# Altium PCB MCU.PcbDoc (part 3 of 3)
Units mm, origin at the board's own origin, x right, y up, seen from the top; angles counter-clockwise.
Board outline 98.27 x 98.24 mm, 2 copper layers (Top Layer, Bottom Layer); 274 components, 263 nets, 1117 pads, 8 vias.
Unrouted connection lines stored in the file: 819.
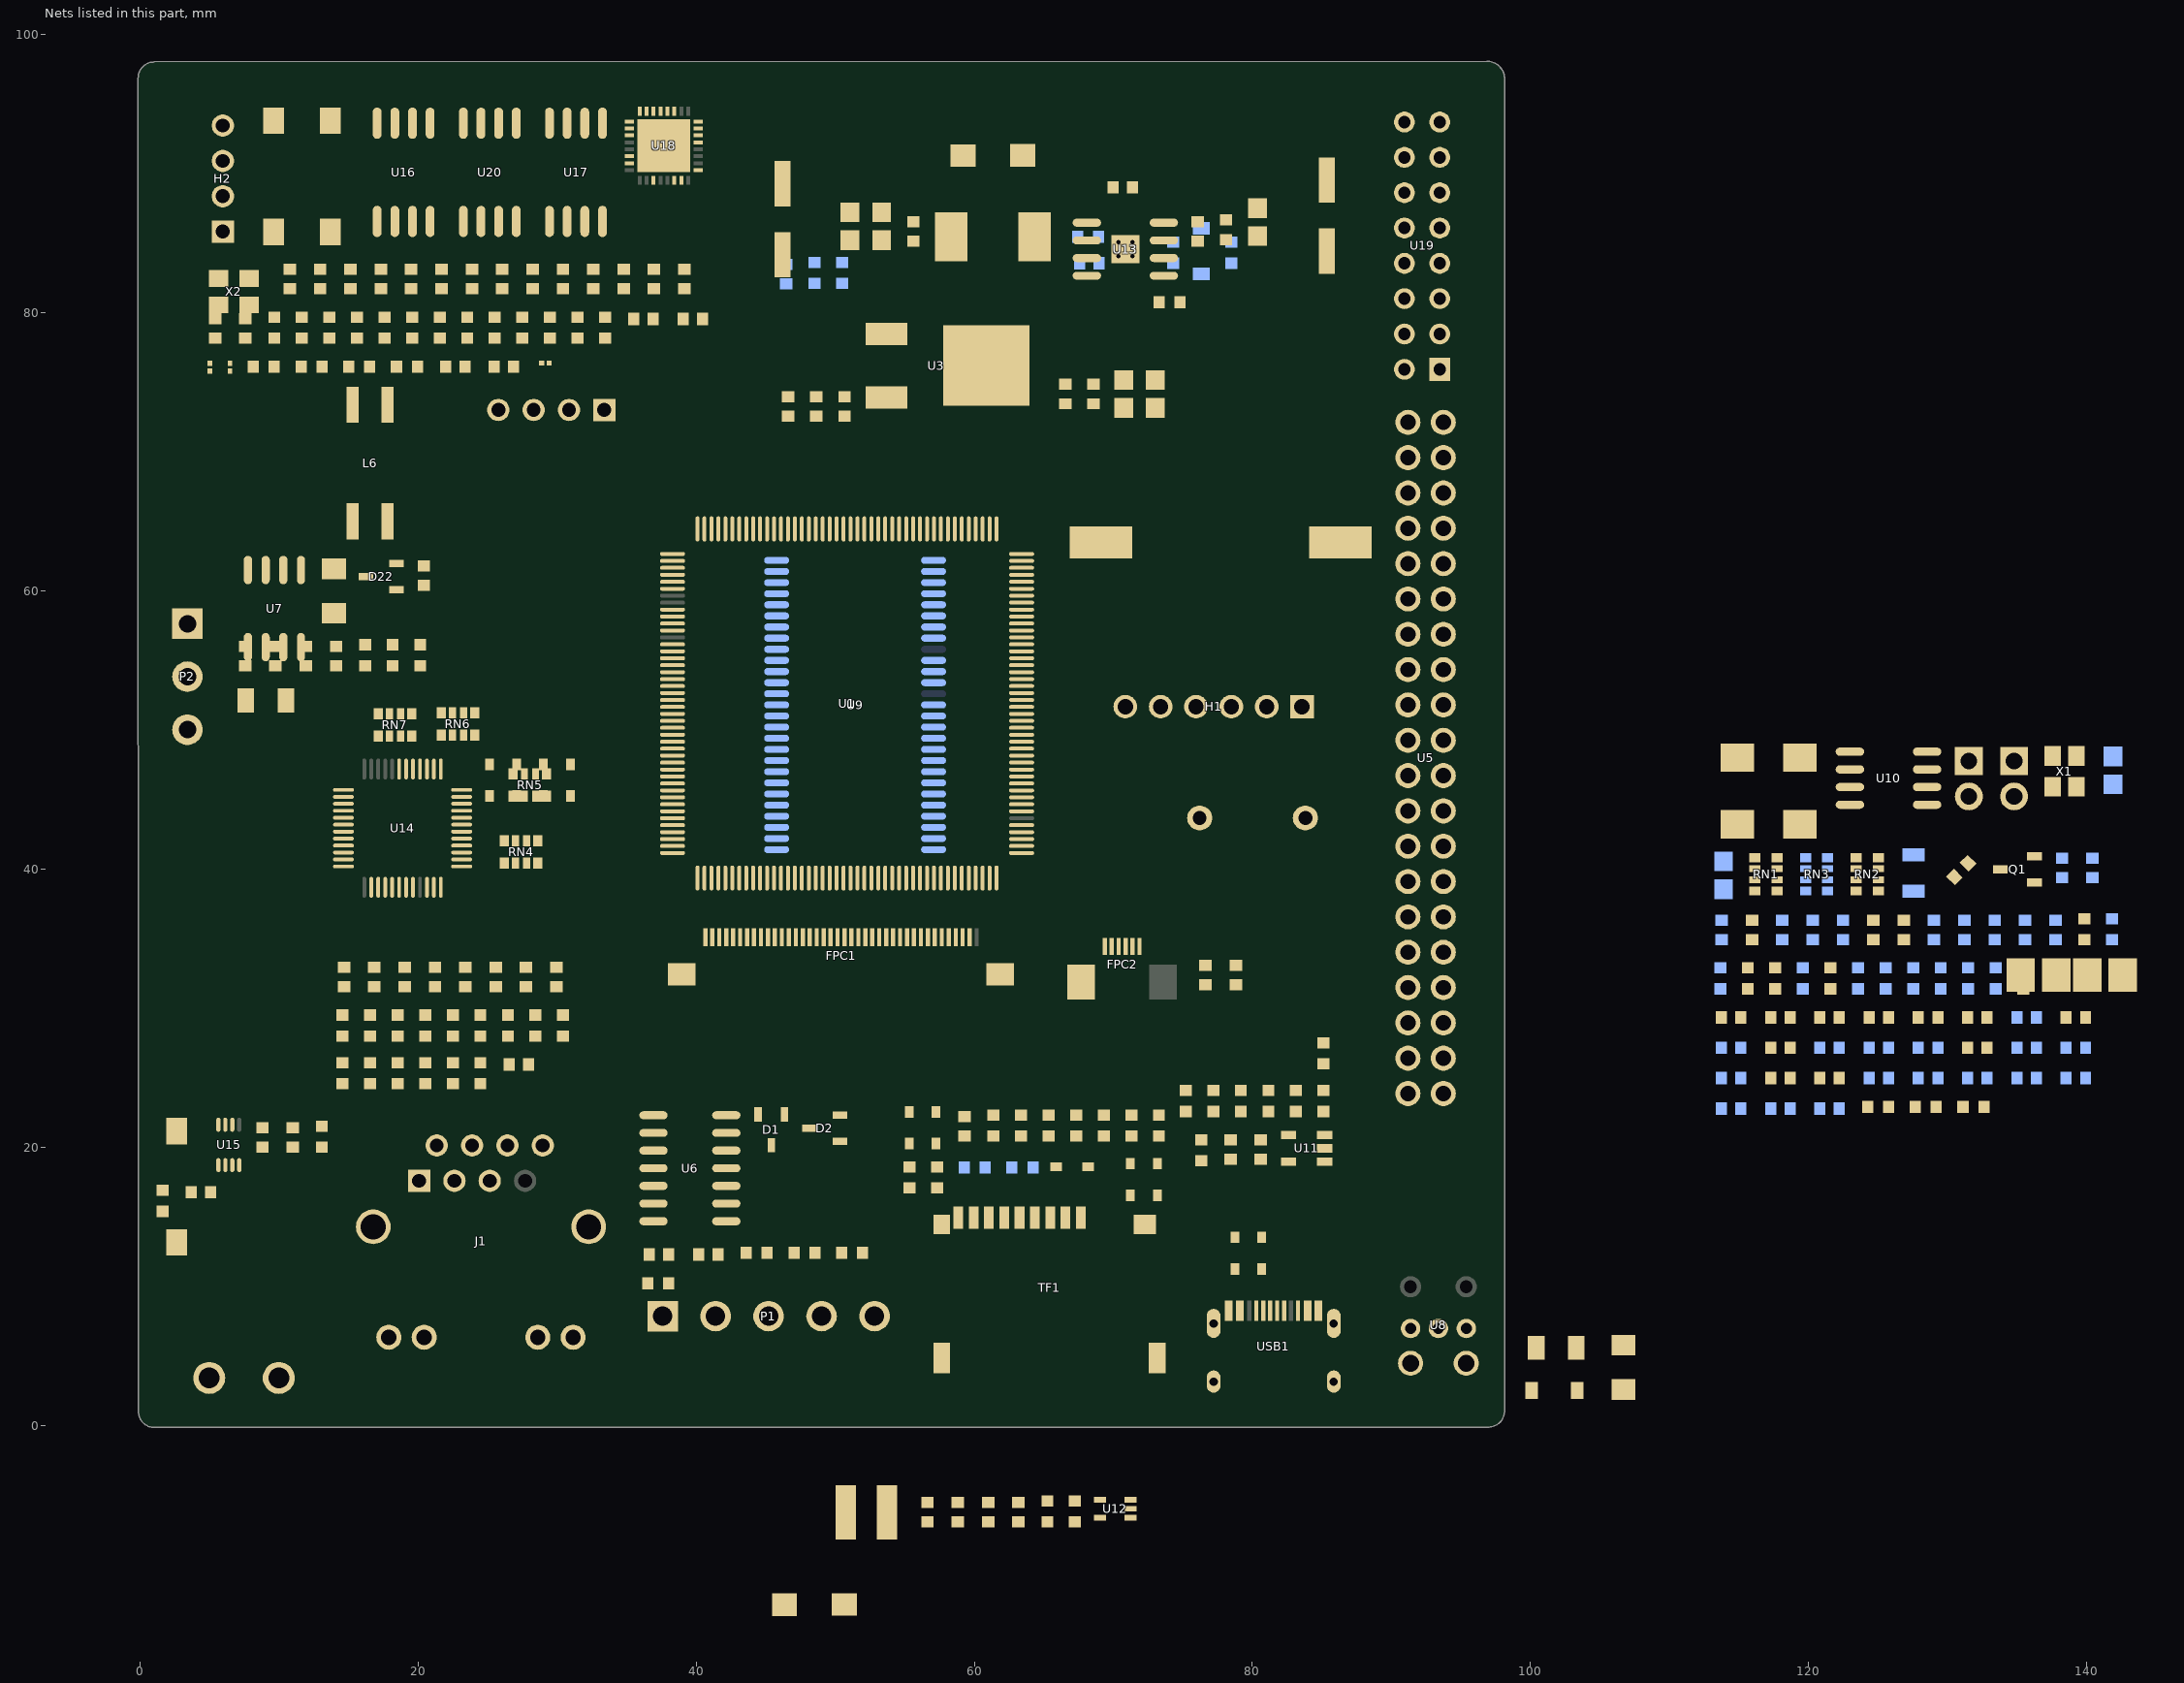
[diagram p2: the nets of this part, all layers, seen from the top]

## Via types
v1: diameter 0.61, hole 0.305, Top Layer to Bottom Layer, 4 vias
v2: diameter 5, hole 3.2, Top Layer to Bottom Layer, 3 vias
v3: diameter 4.7, hole 3.2, Top Layer to Bottom Layer, 1 vias

## Nets (pads, with @x,y where several pads share a name; then routed paths per layer and width w, separated by ;. In a path a pad name is that pad's centre, name@x,y a point inside that pad or via, vN(x,y) a via of type N, cw(c..) or ccw(c..) an arc to the next point about the centre after c; other vN are vias at no path point) (continued)
NetRN4_7: RN4.7 U14.38
NetRN4_8: RN4.8 U14.34
NetRN5_5: RN5.5 U14.44
NetRN5_6: RN5.6 U14.43
NetRN5_7: RN5.7 U14.42
NetRN5_8: RN5.8 U14.41
NetRN6_5: RN6.5 U14.2
NetRN6_6: RN6.6 U14.1
NetRN6_7: RN6.7 U14.46
NetRN6_8: RN6.8 U14.45
NetRN7_5: RN7.5 U14.6
NetRN7_6: RN7.6 U14.5
NetRN7_7: RN7.7 U14.4
NetRN7_8: RN7.8 U14.3
OE_SYNC: U1.94 U5.36
OUT2: U1.163 U6.12
PDR_ON: R70.1 U1.171
PE: C109.2 C111.2 J1.SH1 J1.SH2 R76.2 R80.2 TF1.10 TF1.11 TF1.12 TF1.13 U19.1 USB1.13 USB1.14 USB1.15 USB1.16
PWR_DIRECT: U1.12 U19.7
PWR_SSTART: U1.111 U19.8
RCC_OSC32_IN: C10.1 U1.9 U4.2
RCC_OSC32_OUT: C12.1 U1.10 U4.1
RCC_OSC_IN: C9.1 U1.29 X1.1
RCC_OSC_OUT: C11.1 U1.30 X1.3
RD+: D15.1 J1.3 R61.1 U14.14
RD-: D14.1 J1.6 R36.2 U14.13
RESET: C1.2 D9.1 H1.6 R4.2 U1.31 U5.38
RF: C90.2 L4.1
RTC_REF: U1.88 U19.2
SD_DETECT: R89.2 U1.7
SDMMC1_CK: R86.2 U1.141
SDMMC1_CMD: R85.2 U1.144
SDMMC1_D0: R87.2 U1.121
SDMMC1_D1: R88.2 U1.122
SDMMC1_D2: R83.2 U1.139
SDMMC1_D3: R84.2 U1.140
SPI2_CLK: RN3.2 U5.25
SPI2_CSA: U1.132 U5.27
SPI2_CSB: RN3.8 U5.14
SPI2_IRQ: U1.13 U5.13
SPI2_MISO: U1.87 U5.16
SPI2_MOSI: RN3.3 U5.17
SPI4_CLK: RN1.1 U5.12
SPI4_CSA: RN1.2 U5.30
SPI4_CSB: RN1.3 U5.11
SPI4_IRQ: U1.174 U5.10
SPI4_MISO: U1.4 U5.29
SPI4_MOSI: RN1.4 U5.28
SPI5_CLK: RN2.1 U5.9
SPI5_CSA: RN2.2 U5.6
SPI5_CSB: U1.156 U5.7
SPI5_IRQ: U1.28 U5.5
SPI5_MISO: RN2.4 U5.32
SPI5_MOSI: RN2.3 U5.31
SPICLK: R54.2 U20.6
SPICLK_2: U1.154 U16.6 U17.6
SPICS0: R55.2 U20.1
SPICS_2: R66.2 U1.153 U16.1
SPICS_3: R67.2 U1.155 U17.1
SPID: R53.2 U20.5
SPID_2: U1.151 U16.5 U17.5
SPIQ: R52.2 U20.2
SPIQ_2: RN3.5 U16.2 U17.2
SYS_JTCK-SWCLK: D5.1 H1.4 U1.137
SYS_JTDO-SWO: D8.1 H1.5 U1.161
SYS_JTMS-SWDIO: D4.1 H1.3 U1.128
TD+: D17.1 J1.1 R62.1 U14.17
TD-: D16.1 J1.2 R37.2 U14.16
TFT_BRIGHTNESS: U1.93 U12.4
U0RXD: H2.2 U1.157 U18.27
U0TXD: H2.1 R49.2 U1.152
UART_RX/DIN1: R9.1 U1.150 U5.2
UART_TX/OUT1: U1.147 U5.39 U6.9
USB_OTG_FS_D_N: R24.2 U1.126
USB_OTG_FS_D_P: R23.2 U1.127
USB_OTG_FS_OC: R72.2 U1.146 U11.3
USB_OTG_FS_PSO: R42.1 U1.176 U11.4
USB_OTG_FS_VBUS: R43.2 R44.1 U1.124
USER_SW: C112.2 KEY1.1 R81.1 U1.56 U15.1
pads on no net: FPC1.40 FPC2.7 J1.7 U1.51 U1.52 U1.57 U1.138 U8.S1 U8.S2 U9.36 U9.40 U14.8 U14.9 U14.10 U14.11 U14.12 U14.25 U14.33 U15.5 U18.4 U18.5 U18.8 U18.9 U18.10 U18.12 U18.13 U18.16 U18.18 U18.19 U18.20 U18.25 U18.26 USB1.A8 USB1.B8
copper on no net: | length 764.1
  Top Layer w0.203: 2.229,2.229 2.229,95.71 95.73,95.744 95.786,2.229 2.229,2.229
  Top Layer w0.254: 0,1.008 0,96.901 ; 0.008,96.893 cw(c1.024,96.893) 1.024,97.909 ; 0.029,1.008 ccw(c1.045,1.008) 1.045,-0.008 ; 1.037,97.938 96.901,97.973 cw(c96.901,96.916) 97.958,96.916 98.015,1.045 ; 1.045,0 97.028,0 ; 97.02,0.008 ccw(c97.02,1.024) 98.036,1.024
  other v2: 3.175,29.083 3.048,70.231 76.454,94.615
  other v3: 93.345,16.383

## Silkscreen, mask and mechanical layers (free items; w line width, h text height)
Top Overlay:
  lines w0.254: 0.127,51.816 27.813,51.816 32.512,56.515 ; 0.381,71.501 43.434,71.501 ; 32.512,0.127 32.512,56.515 ; 32.512,71.628 32.512,56.515 ; 32.893,28.067 88.773,28.067 89.281,27.559 89.281,0.381 89.154,0.254 ; 43.434,97.79 43.434,71.501 ; 97.536,69.85 97.536,69.723 45.212,69.723 43.434,71.501
Mechanical 5:
  lines w0.254: 0,1.008 0,96.901 ; 0.008,96.893 cw(c1.024,96.893) 1.024,97.909 ; 0.029,1.008 ccw(c1.045,1.008) 1.045,-0.008 ; 1.037,97.938 96.901,97.973 cw(c96.901,96.916) 97.958,96.916 98.015,1.045 ; 1.045,0 97.028,0 ; 97.02,0.008 ccw(c97.02,1.024) 98.036,1.024

## Text inside footprints (layer, text, board x,y; h text height)
BUZZER1: Top Overlay "+" at 75.413,44.799 h1.14